# Altium PCB Relay Board.PcbDoc
Units mm, origin at the board's own origin, x right, y up, seen from the top; angles counter-clockwise.
Board outline 209.55 x 146.05 mm, 2 copper layers (Top, Bottom Layer), stack 2.342 mm thick; 12 components, 14 nets, 62 pads, 29 vias.
Unrouted connection lines stored in the file: 5.
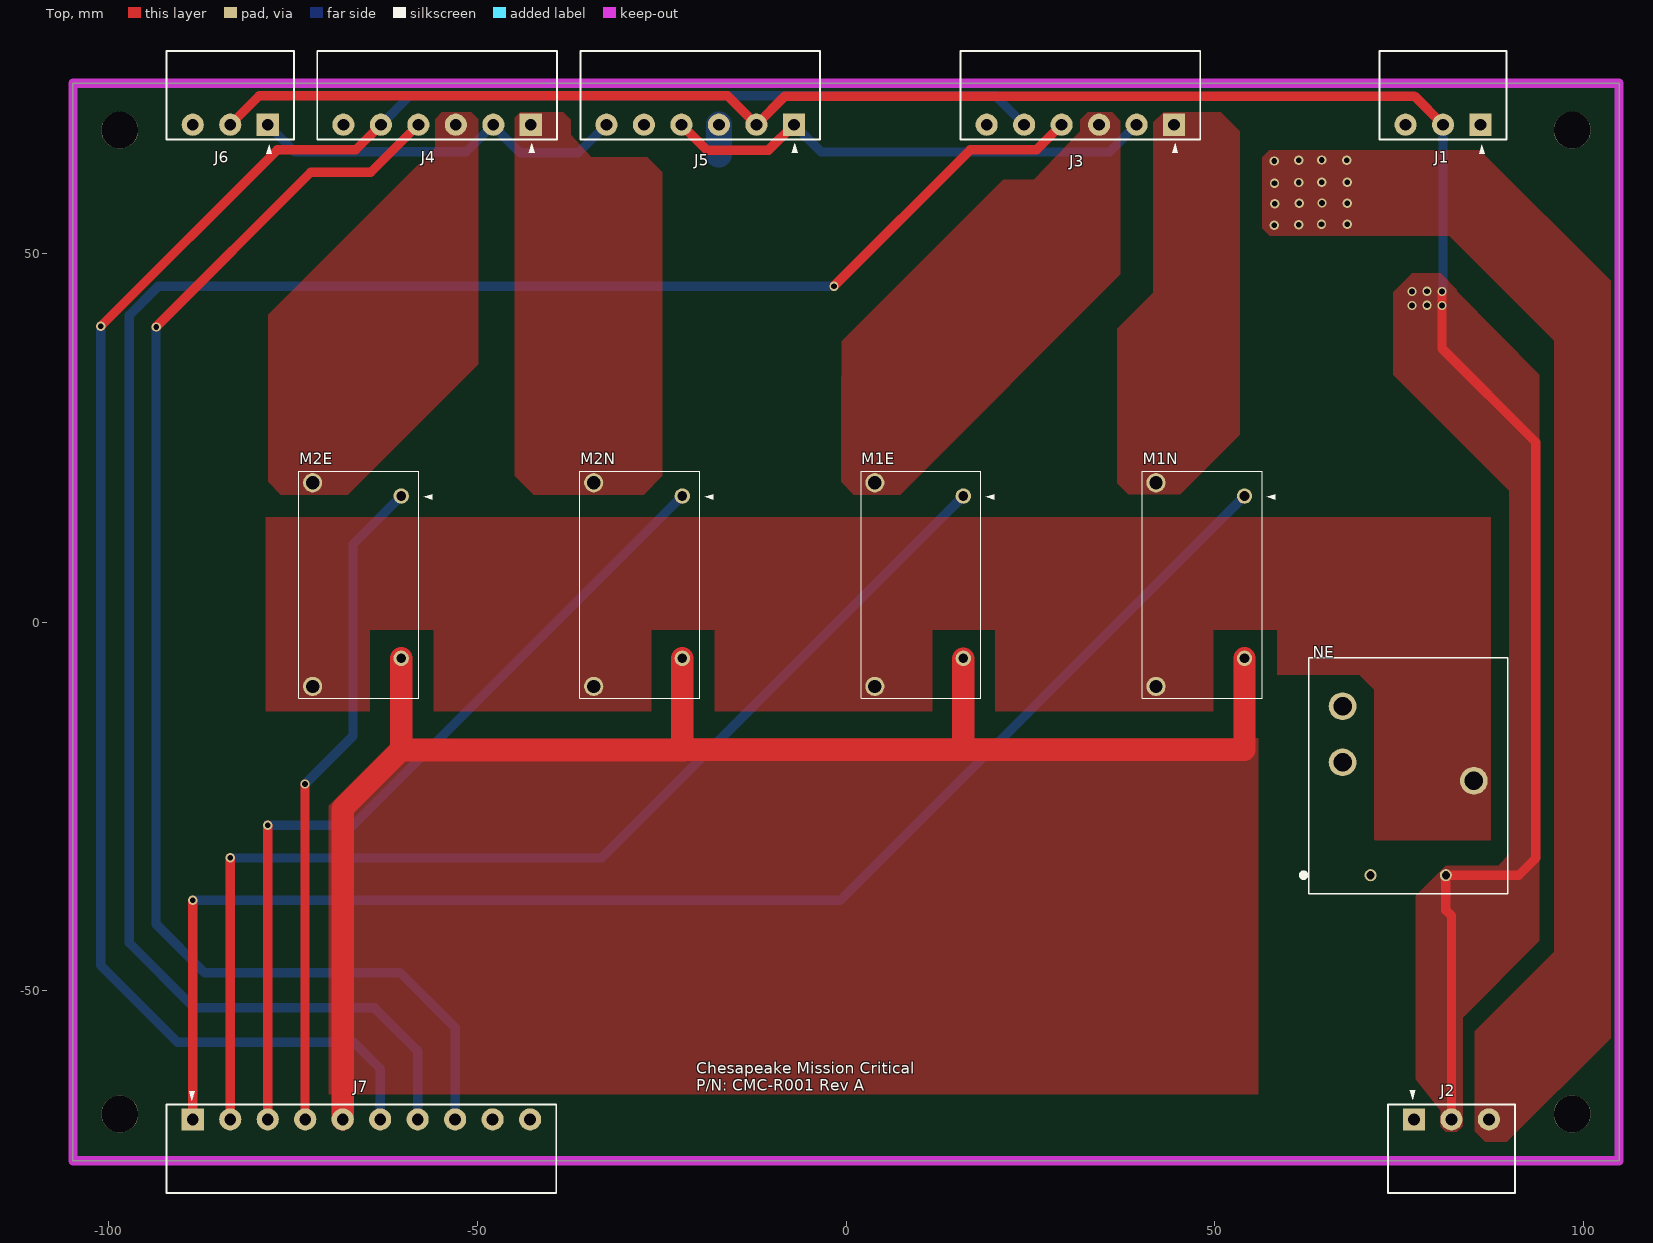
[diagram p0: Top view]
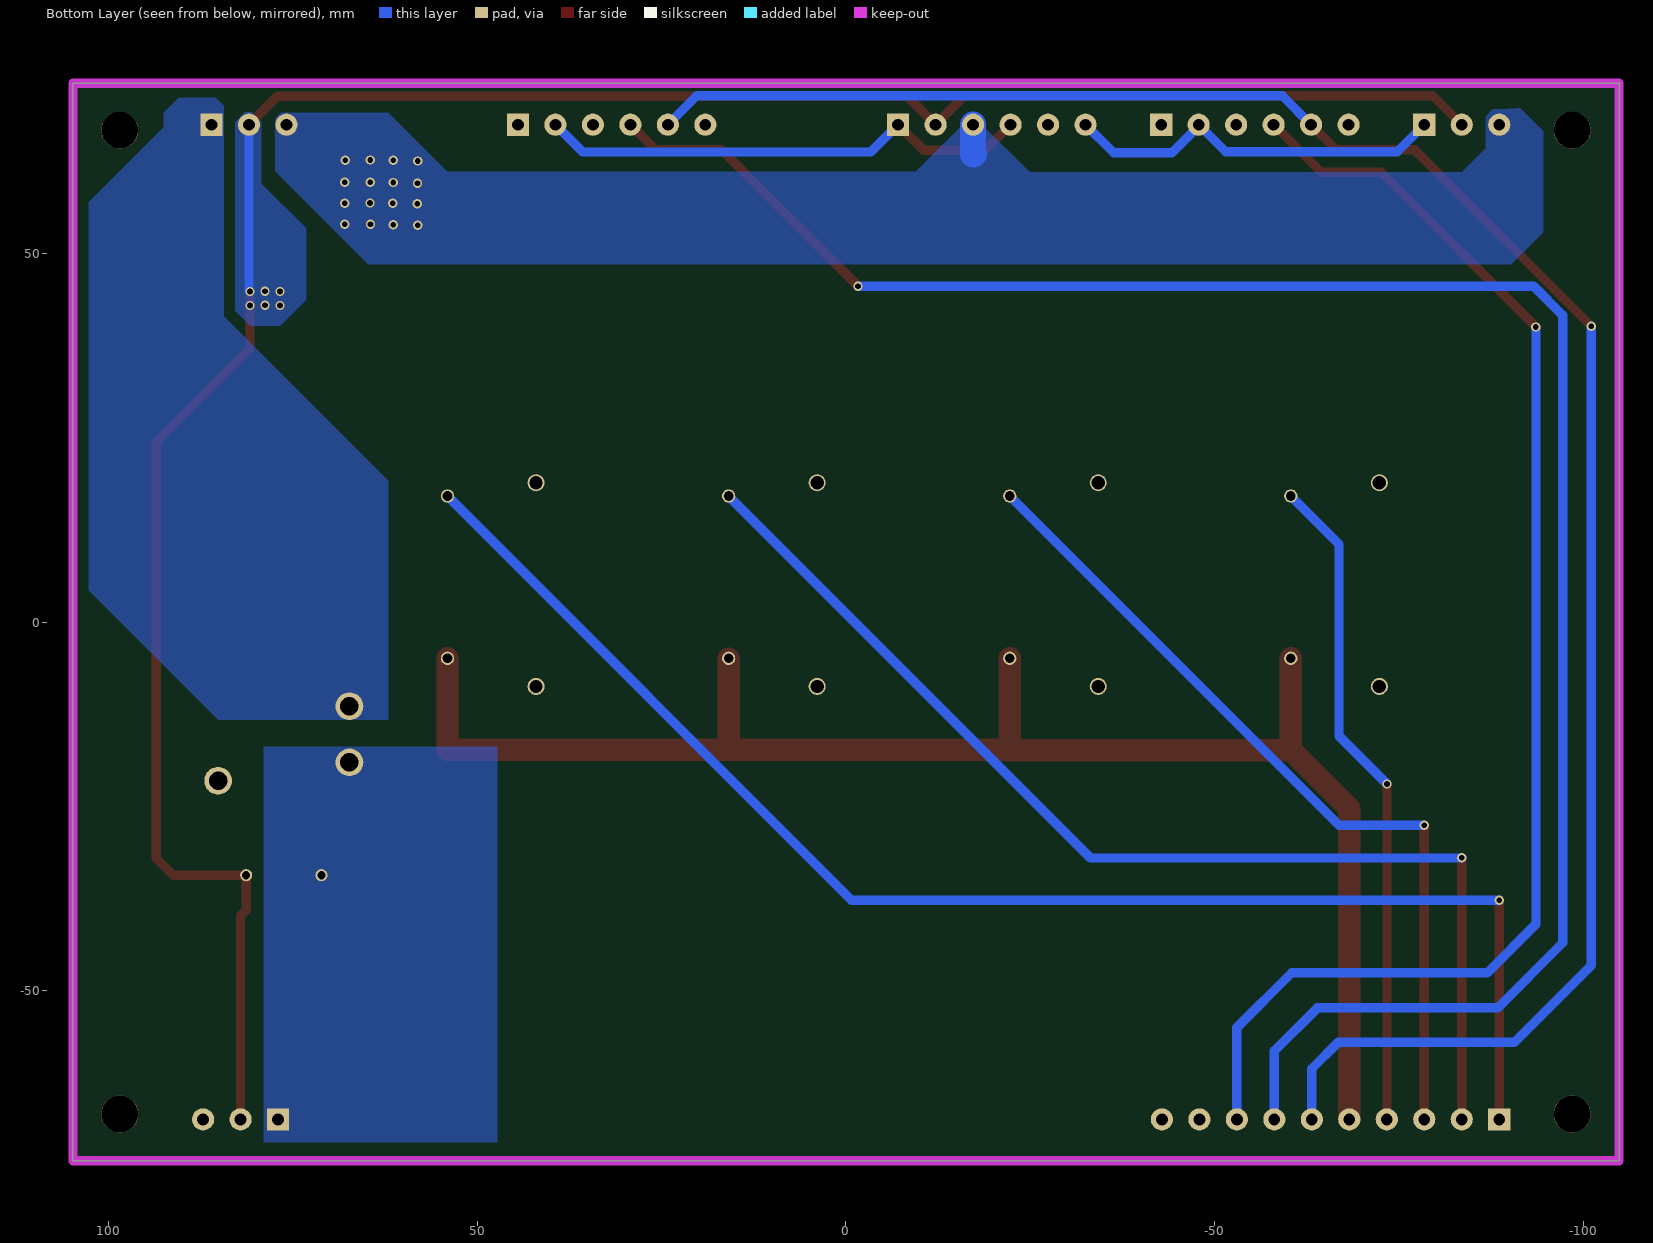
[diagram p1: Bottom Layer view, seen from below]
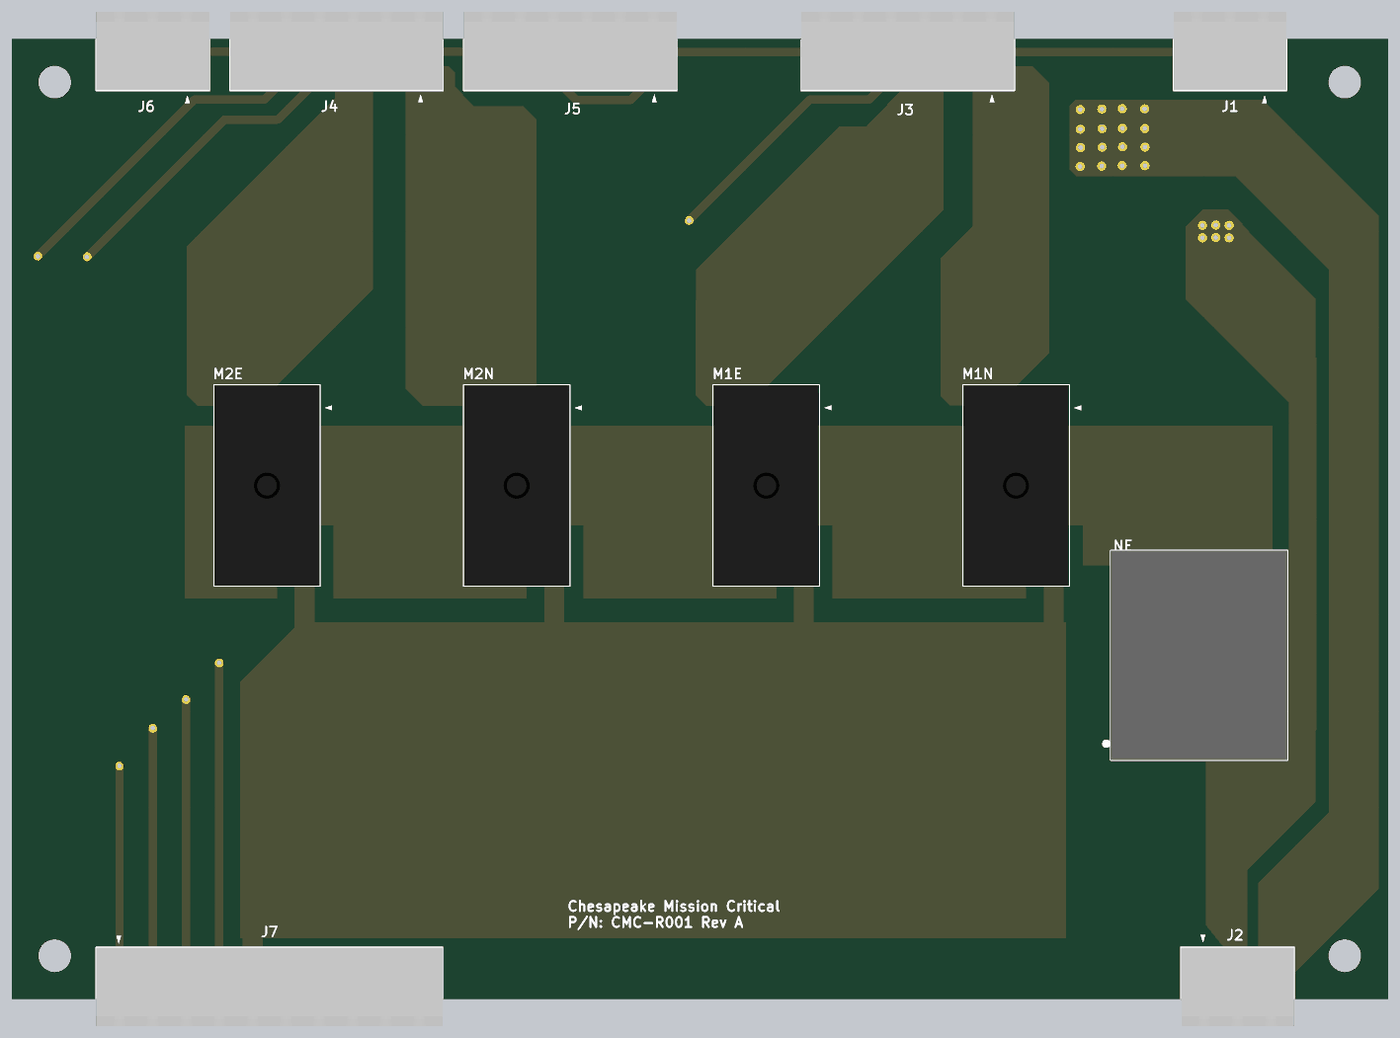
[diagram p2: 3D render of the assembled board from above, using the file's embedded part models]

## Layer stack, top to bottom
Solder Mask Top: solder mask 0.01, Solder Resist, Dk 3.5
Top: signal copper 0.105
Dielectric: dielectric 2.1322, FR-4, Dk 4.2
Bottom Layer: signal copper 0.105
Bottom Solder: solder mask 0.01, Solder Resist, Dk 3.5

## Board outline
-104.775,-73.025 -104.775,-61.912 -104.775,-62.484 -104.775,61.976 -104.775,61.912 -104.775,73.025 104.775,73.025 104.775,61.912 104.775,-49.276 104.775,-73.025

## Design rules (kind name [scope] priority, off if disabled: settings)
Clearance Clearance_Default [All] p1: gap=0.203 ignorepadtopadclearanceinfootprint=FALSE except(0.254: Track-Poly)
ComponentClearance "ComponentClearance - Default - DEFAULT" [All] p1: gap=0 collisioncheckmode=3 verticalgap=0.254 showdistances=FALSE
FanoutControl Fanout_SOIC [IsSOIC] p1: bgadir=Out bgaviamode=Centered fanoutstyle=Auto fanoutdirection=Alternating viagrid=0.025 // Fanout_SOIC (Default Rule)
FanoutControl Fanout_Small [(CompPinCount < 5)] p2: bgadir=Out bgaviamode=Centered fanoutstyle=Auto fanoutdirection=OutThenIn viagrid=0.025 // Fanout_Small (Default Rule)
FanoutControl Fanout_LCC [IsLCC] p3: bgadir=Out bgaviamode=Centered fanoutstyle=Auto fanoutdirection=Alternating viagrid=0.025 // Fanout_LCC (Default Rule)
FanoutControl Fanout_BGA [IsBGA] p4: bgadir=Out bgaviamode=Centered fanoutstyle=Auto fanoutdirection=Alternating viagrid=0.025 // Fanout_BGA (Default Rule)
Height [All] p1: minheight=0 maxheight=30 prefheight=12.7
HoleSize [All] p1: absolutevalues=TRUE maxlimit=5.08 minlimit=0.025 maxpercent=80.000 minpercent=20.000
HoleToHoleClearance "HoleToHoleClearance - Default - DEFAULT" [All] p1: gap=0.305 allowstackedmicrovias=TRUE
Length "Default Length" [All] p1: maxlimit=1270 minlimit=0
MaxMinImpedance "Default Impedance" [All] p1: minimum=50.00 maximum=150.0
MinimumSolderMaskSliver [All] p1: minsoldermaskwidth=0.127
ParallelSegment "Default Parallel Segment Adjasent" [All] p1 off: limit=25.4 gap=5.08
ParallelSegment "Default Parallel Segment Same Layer" [All] p2 off: limit=25.4 gap=5.08
PlaneConnect "Default PlaneConnect" [All] p1: planeconnectstyle=Direct reliefexpansion=0.508 reliefentries=4 reliefconductorwidth=0.381 reliefairgap=0.254
PolygonConnect [All] p1: thpad.connectstyle=Direct thpad.reliefconductorwidth=0.254 thpad.reliefentries=4 thpad.polygonreliefangle="90 Angle" thpad.airgapwidth=0.254 smdpad.connectstyle=Relief smdpad.reliefconductorwidth=0.203 smdpad.reliefentries=4 smdpad.polygonreliefangle="90 Angle" smdpad.airgapwidth=0.203 via.connectstyle=Direct via.reliefconductorwidth=0.254 via.reliefentries=4 via.polygonreliefangle="90 Angle" via.airgapwidth=0.254
RoomDefinition "Relay Board" [InComponentClass('Relay Board')] p1 off: confinementstyle=ConfineIn formatcopy=TRUE lockcomponents=FALSE outline 89.617,31.631 330.663,31.631 330.663,53.221 89.617,53.221
RoutingLayers "RoutingLayers - Default - DEFAULT" [All] p1: top layer_v5=TRUE bottom layer_v5=TRUE
RoutingPriority "RoutingPriority - Default - DEFAULT" [All] p1: routingpriority=3
RoutingTopology "Default Routing Topology" [All] p1: topology=Shortest
RoutingVias "RoutingVias - Default - DEFAULT" [All] p1: holewidth=0.406 width=0.813 viastyle="Through Hole" minholewidth=0.25 minwidth=0.5 maxholewidth=0.406 maxwidth=0.813
SMDToCorner "SMDToCorner - Default - DEFAULT" [All] p1: distance=0
SilkToSilkClearance [All] p1: silktosilkclearance=0.102
SilkToSolderMaskClearance [IsPad] p1: minsilkscreentomaskgap=0.102 clearancetoexposedcopper=TRUE
SolderMaskExpansion "SolderMaskExpansion from CAM settings" [All] p1: expansion=0.051 istentingtop=FALSE
Width "Default Width" [All] p1: maxlimit=6.35 minlimit=0.152 preferedwidth=0.508 minimp=50.000000 maximp=50.000000 favimp=50.000000
15 further rules are at their usual default settings.

## Components (designator, comment, footprint, x,y, rotation, side; value= is the part's Value field where it differs from the comment)
J1 "0395321003" HDR1X3_MOLEX_TERMINAL 89.535,65.405 r180 top locked
J2 "0395321003" HDR1X3_MOLEX_TERMINAL 73.437,-65.405 r0 top locked
J3 "0395321006" HDR1X6_MOLEX_TERMINAL 48.005,65.405 r180 top locked
J4 "0395321006" HDR1X6_MOLEX_TERMINAL -39.18,65.405 r180 top locked
J5 "0395321006" HDR1X6_MOLEX_TERMINAL -3.525,65.405 r180 top locked
J6 "0395321003" HDR1X3_MOLEX_TERMINAL -74.835,65.405 r180 top locked
J7 "0395321010" HDR1X10_MOLEX_TERMINAL -92.075,-65.405 r0 top locked
M1E "G6QE-1A DC24" RELAY_G6QE-1A_OMR 10.16,5.08 r0 top locked
M1N "G6QE-1A DC24" RELAY_G6QE-1A_OMR 48.26,5.08 r0 top locked
M2E "G6QE-1A DC24" RELAY_G6QE-1A_OMR -66.04,5.08 r0 top locked
M2N "G6QE-1A DC24" RELAY_G6QE-1A_OMR -27.94,5.08 r0 top locked
NE "J115F21C120VACS" RELAY_J115F2 76.2,-22.86 r0 top

## Footprints (in the part's own frame and the unit in brackets; to place one, negate y for a bottom-side part, rotate by r counter-clockwise, add the part's x,y. Pads: shape width x height; smd on the part's side, far side on the other; paste and mask are expansions set on the pad)
HDR1X3_MOLEX_TERMINAL [mm]
  rect 3x3 hole 1.6: 1(3.54,-2)
  round 3 hole 1.6: 2(8.62,-2) 3(13.7,-2)
  silkscreen extent 0,-12 17.24,1.96, body extent -0.01,-12 17.24,-0.06, height 8.38
HDR1X6_MOLEX_TERMINAL [mm]
  rect 3x3 hole 1.6: 1(3.54,-2)
  round 3 hole 1.6: 2(8.62,-2) 3(13.7,-2) 4(18.78,-2) 5(23.86,-2) 6(28.94,-2)
  silkscreen extent 0,-12 32.48,1.81, body extent -0.01,-12 32.48,-0.06, height 8.38
HDR1X10_MOLEX_TERMINAL [mm]
  rect 3x3 hole 1.6: 1(3.54,-2)
  round 3 hole 1.6: 2(8.62,-2) 3(13.7,-2) 4(18.78,-2) 5(23.86,-2) 6(28.94,-2) 7(34.02,-2) 8(39.1,-2) 9(44.18,-2) 10(49.26,-2)
  silkscreen extent 0,-12 52.8,1.81, body extent 0,-12 52.8,-0.06, height 8.38
RELAY_G6QE-1A_OMR [mm]
  round 2.1 / inner round 1.808 / far side round 1.808 hole 1.3 mask+0: 1(5.75,12) 2(5.75,-10)
  round 2.6 / inner round 2.308 / far side round 2.308 hole 1.8 mask+0: 3(-6.25,-13.8) 4(-6.25,13.8)
  silkscreen extent -8.13,-15.38 9.94,15.38, body extent -8,-15.25 8,15.25, height 20.5
RELAY_J115F2 [mm]
  round 1.65 hole 1.1: 1(-5.1,-11.45) 2(5.1,-11.45)
  round 3.75 hole 2.5: 3(8.9,1.35) 4(-8.9,3.85) 5(-8.9,11.45)
  silkscreen extent -14.42,-13.96 13.5,18.05, body extent -13.5,-13.95 13.5,18.05, height 27.95

## Part data
J1 J2 J6: library part MOLEX_0395321003, "TERM BLOCK HDR 3POS 90DEG 5.08MM", Manufacturer=Molex, Package=None, Supplier Part Number 1=WM7846-ND, Manufacturer Part Number=0395321003, Supplier 1=Digi-Key
J3 J4 J5: library part MOLEX_0395321006, "TERM BLOCK HDR 6POS 90DEG 5.08MM", Manufacturer=Molex, Package=None, Supplier Part Number 1=900-0395321006-ND, Manufacturer Part Number=0395321006, Supplier 1=Digi-Key
J7: library part MOLEX_0395321010, "TERM BLOCK HDR 10POS 5.08MM", Manufacturer=Molex, Package=None, Supplier Part Number 1=WM7851-ND, Manufacturer Part Number=0395321010, Supplier 1=Digi-Key
M1E M1N M2E M2N: "RELAY PWR PCB SPST-NO 32A 24VDC", Manufacturer=Omron, Supplier Part Number 1=653-G6QE-1ADC24, Copyright="Copyright (C) 2022 Ultra Librarian. All rights reserved.", Manufacturer Part Number="G6QE-1A DC24", Supplier 1=Mouser, Type=DEV
NE: "RELAY UL & TUV GEN PURP SPDT 40A", Manufacturer="CIT Relay and Switch", Supplier Part Number 1=2449-J115F21C120VACS-ND, Manufacturer Part Number=J115F21C120VACS, Supplier 1=Digi-Key, Type=DEV

## Free pads (board coordinates)
  round 5 hole 5 unplated: MH(-98.425,-66.675) MH(-98.425,66.675) MH(98.425,-66.675) MH(98.425,66.675)

## Via types
v1: diameter 1.27, hole 0.762, Top to Bottom Layer, 29 vias

## Nets (pads, with @x,y where several pads share a name; then routed paths per layer and width w, separated by ;. In a path a pad name is that pad's centre, name@x,y a point inside that pad or via, vN(x,y) a via of type N, cw(c..) or ccw(c..) an arc to the next point about the centre after c; other vN are vias at no path point)
NetJ1_1: J1.1 NE.5
NetJ1_2: J1.2 J2.2 J5.2 J6.2 NE.2 | length 322.1
  Top w1.27: J6.2 -79.536,71.324 -16.064,71.324 J5.2 -8.265,71.285 77.035,71.285 J1.2 ; v1(80.772,44.804) 80.772,37.084 93.472,24.384 93.472,-32.004 91.166,-34.31 NE.2 81.3,-39.036 82.057,-39.794 J2.2
  Bottom Layer w1.27: v1(80.772,44.804) 80.915,44.947 J1.2
  other v1: 76.708,42.908 80.772,42.908 78.74,42.957 76.708,44.804 78.74,44.853
NetJ1_3: J1.3 J2.1 J5.3 J6.3 | length 4.5
  Bottom Layer w1.27: J5.3 J5.3@-16.858,67.405
  Bottom Layer w3.556: -17.225,63.41 -17.286,63.41 -17.321,63.445 -17.225,63.541 J5.3
  other v1: 58.04,53.792 61.345,53.863 64.45,53.918 67.933,53.918 58.104,56.677 61.409,56.747 67.933,56.771 64.514,56.803 58.083,59.497 61.387,59.568 67.912,59.591 64.492,59.623 58.056,62.496 61.361,62.566 67.885,62.59 64.466,62.622
NetJ3_1: J3.1 M1N.4
NetJ3_2: J3.2 J5.1 J5.4 | length 67.6
  Top w1.27: J5.4 -18.87,63.97 -10.5,63.97 J5.1
  Bottom Layer w1.27: J5.1 -3.368,63.708 35.688,63.708 J3.2
NetJ3_3: J3.3 M1E.4
NetJ3_4: J3.4 J7.4 | length 276.6
  Top w1.27: v1(-1.621,45.529) 16.858,64.008 25.828,64.008 J3.4
  Bottom Layer w1.27: -58.055,-67.405 -58.055,-58.122 -63.887,-52.29 -88.327,-52.29 -97.157,-43.46 -97.157,41.565 -93.194,45.529 v1(-1.621,45.529)
NetJ3_5: J3.5 J4.5 J7.5 | length 276.9
  Top w1.27: v1(-100.994,40.081) -77.067,64.008 -66.437,64.008 J4.5
  Bottom Layer w1.27: v1@-100.996,40.081 -100.996,-46.536 -90.56,-56.973 -66.693,-56.973 -63.135,-60.53 -63.135,-67.405 ; J4.5 -59.121,71.324 20.226,71.324 J3.5
NetJ4_1: J4.1 M2N.4
NetJ4_2: J4.2 J5.6 J6.1 | length 52.2
  Bottom Layer w1.27: J6.1 -74.715,63.745 -51.46,63.745 J4.2 -47.8,67.222 -44.174,63.596 -36.274,63.596 J5.6
NetJ4_3: J4.3 M2E.4
NetJ4_4: J4.4 J7.3 | length 186.6
  Top w1.27: v1(-93.506,39.985) -72.53,60.96 -64.405,60.96 J4.4
  Bottom Layer w1.27: v1@-93.516,39.961 -93.516,-40.932 -86.929,-47.52 -60.404,-47.52 -52.975,-54.949 -52.975,-67.405
NetJ7_6: J7.6 M1E.2 M1N.2 M2E.2 M2N.2 | length 217.2
  Top w3.048: -68.215,-67.405 -68.215,-25.275 -60.29,-17.35 ; M2E.2 -60.29,-17.35 ; M2N.2 -22.19,-17.35 ; -21.968,-17.35 -22.19,-17.35 ; -21.968,-17.319 15.863,-17.319 ; M1E.2@15.863,-4.967 15.863,-17.319 ; M1N.2 54.01,-17.319 15.863,-17.319 ; -60.29,-17.35 -22.19,-17.35
NetM1E_3: M1E.3 M1N.3 M2E.3 M2N.3 NE.3
pads on no net: J2.3 J3.6 J4.6 J5.5 J7.1 J7.2 J7.7 J7.8 J7.9 J7.10 M1E.1 M1N.1 M2E.1 M2N.1 NE.1 NE.4
copper on no net: | length 554.6
  Top w1.27: -88.535,-67.405 v1(-88.535,-37.691) ; -83.455,-67.405 v1(-83.455,-31.92) ; -78.375,-67.405 v1(-78.375,-27.542) ; v1(-73.326,-21.941) -73.326,-67.374 -73.295,-67.405
  Bottom Layer w1.27: v1(-88.535,-37.691) -0.761,-37.691 54.01,17.08 ; v1(-83.455,-31.92) -83.392,-31.984 -33.154,-31.984 15.91,17.08 ; v1(-78.375,-27.542) -66.812,-27.542 -22.19,17.08 ; v1(-73.326,-21.941) -66.812,-15.428 -66.812,10.558 -60.29,17.08

## Polygon pours and split planes (outlines as drawn)
NetJ1_2 on Bottom Layer "NETJ1_2_L02_P010" (solid, pour order 10): 79.248,67.777 80.559,69.088 81.468,69.088 82.804,67.752 82.804,42.164 80.772,40.132 76.708,40.132 73.152,43.688 73.152,53.34 79.248,59.436
NetJ1_1 on Bottom Layer "NETJ1_1_L02_P000" (solid, pour order 0): 84.328,69.969 84.328,41.466 62.03,19.167 62.03,-13.245 85.065,-13.245 102.616,4.306 102.616,56.896 92.456,67.056 92.456,69.037 90.424,71.069 85.417,71.069
NetJ1_3 on Bottom Layer "NETJ1_3_L02_P007" (solid, pour order 7): -88.535,69.513 -87.685,69.513 -86.679,68.506 -86.679,64.202 -83.421,60.944 -24.876,60.944 -17.979,67.842 -16.229,67.842 -9.438,61.051 54.073,61.051 62.063,69.04 76.58,69.04 77.335,68.285 77.335,61.079 64.78,48.524 -90.18,48.524 -94.488,52.832 -94.488,66.548 -91.415,69.621 -90.814,69.621
no net on Bottom Layer "NONET_L02_P001" (solid, pour order 1): 78.889,-16.874 47.244,-16.874 47.244,-70.528 78.889,-70.528
NetJ1_2 on Top "NETJ1_2_L01_P011" (solid, pour order 11): 82.804,44.853 82.804,45.047 80.607,47.244 76.708,47.244 76.708,47.226 74.168,44.686 74.168,33.528 89.916,17.78 89.916,-31.496 88.392,-33.02 81.28,-33.02 77.216,-37.084 77.216,-61.976 80.607,-66.214 80.607,-68.415 81.28,-69.088 82.804,-69.088 83.557,-68.335 83.557,-53.603 93.98,-43.18 93.98,33.54
NetM1E_3 on Top "NETM1E_3_L01_P002" (solid, pour order 2): 58.42,-7.112 58.42,-1.016 49.784,-1.016 49.784,-12.114 20.204,-12.114 20.204,-1.016 11.691,-1.016 11.691,-12.114 -17.78,-12.114 -17.78,-1.016 -26.416,-1.016 -26.416,-12.114 -55.88,-12.114 -55.88,-1.016 -64.516,-1.016 -64.516,-12.114 -78.612,-12.114 -78.613,14.224 87.376,14.224 87.376,-29.558 71.628,-29.558 71.628,-9.144 69.596,-7.112
NetJ3_1 on Top "NETJ3_1_L01_P003" (solid, pour order 3): 41.656,44.654 36.752,39.75 36.752,18.81 38.228,17.334 45.274,17.334 53.34,25.4 53.34,66.548 50.8,69.088 43.05,69.088 41.656,67.748
NetJ7_6 on Top "NETJ7_6_L01_P009" (solid, pour order 9): -70.104,-64.008 -70.104,-24.892 -60.96,-15.748 55.88,-15.748 55.88,-64.008
NetJ4_3 on Top "NETJ4_3_L01_P006" (solid, pour order 6): -78.295,41.656 -55.7,64.252 -55.7,68.17 -54.782,69.088 -50.79,69.088 -49.873,68.17 -49.873,40.375 -49.873,34.963 -67.558,17.278 -76.582,17.278 -78.295,18.991
NetJ1_3 on Top "NETJ1_3_L01_P008" (solid, pour order 8): 86.665,-70.452 85.246,-68.996 85.246,-55.47 96.012,-44.704 96.012,38.1 81.788,52.324 57.404,52.324 56.388,53.34 56.388,62.992 57.366,63.97 85.89,63.97 103.623,46.237 103.623,-56.397 89.568,-70.452
NetJ4_1 on Top "NETJ4_1_L01_P005" (solid, pour order 5): -24.892,60.96 -26.924,62.992 -34.544,62.992 -37.339,66.04 -37.339,68.076 -38.35,69.088 -44.148,69.088 -44.862,68.375 -44.862,41.606 -44.862,19.8 -42.339,17.278 -27.426,17.278 -24.892,19.812
NetJ3_3 on Top "NETJ3_3_L01_P004" (solid, pour order 4): -0.558,33.409 -0.558,38.05 21.336,59.944 25.472,59.944 31.763,66.548 31.763,68.088 32.762,69.088 36.068,69.088 37.2,67.956 37.2,47.117 7.361,17.278 1.036,17.278 -0.677,18.991 -0.677,33.289

## Keep-outs
Keep-Out Layer:
  lines w1.27: -104.775,-62.484 -104.775,61.976 ; -104.775,-61.912 -104.775,-73.025 104.775,-73.025 104.775,-49.276 104.775,61.912 104.775,73.025 -104.775,73.025 -104.775,61.912

## Other copper
Top:
  text "TOP LAYER" at -11.562,-109.669 h5.08
Bottom Layer:
  text "BOTTOM LAYER" at -16.292,-109.782 h5.08

## Silkscreen, mask and mechanical layers (free items; w line width, h text height)
Silkscreen Top:
  text "Chesapeake Mission Critical / P/N: CMC-R001 Rev A" at -20.32,-63.5 h1.52
  text "SILKSCREEN TOP" at -17.353,-119.424 h5.08
Bottom Overlay:
  text "SILKSCREEN BOTTOM" at 27.94,-119.32 h5.08
Paste Mask Top:
  text "PASTEMASK TOP" at -16.975,-124.21 h5.08
Paste Mask Bottom:
  text "PASTEMASK BOTTOM" at -22.352,-123.892 h5.08
Solder Mask Top:
  text "SOLDERMASK TOP" at -18.739,-128.996 h5.08
Bottom Solder:
  text "SOLDERMASK BOTTOM" at -23.832,-128.996 h5.08
Drill Guide:
  text "DRILL GUIDE" at -13.208,-100.016 h5.08
Board Shape:
  lines w0.254: -2.54,0 2.54,0 ; 0,-2.54 0,2.54
  lines w0.508: -104.775,61.912 -104.775,73.025 104.775,73.025 104.775,49.276 ; -104.775,61.976 -104.775,-61.912 -104.775,-73.025 104.775,-73.025 104.775,-61.912 ; 104.775,-61.976 104.775,49.212
  text "BOARD OUTLINE" at -16.934,-105.154 h5.08
Top Assembly:
  lines w0.254: -2.54,0 2.54,0 ; 0,-2.54 0,2.54
  lines w0.508: -104.775,61.912 -104.775,73.025 104.775,73.025 104.775,49.276 ; -104.775,61.976 -104.775,-61.912 -104.775,-73.025 104.775,-73.025 104.775,-61.912 ; 104.775,-61.976 104.775,49.212
  text "ASSEMBLY TOP" at -16.094,-114.763 h5.08
Bottom Assembly:
  text "ASSEMBLY BOTTOM" at 24.384,-114.748 h5.08
Drill Drawing:
  drawing of 251 lines, arcs and shapes, not listed
  text "1" at -118.161,168.673 h7.62
  text "2" at 21.251,168.673 h7.62
  text "3" at 158.41,168.673 h7.62
  text "4" at 299.207,168.673 h7.62
  text "REVISIONS" at 259.782,160.565 h1.91
  text "ZONE" at 183.244,154.088 h1.91
  text "LTR" at 196.181,154.088 h1.91
  text "DATE" at 318.88,154.088 h1.91
  text "APPROVED" at 339.108,154.088 h1.91
  text "DESCRIPTION" at 245.047,154.028 h1.91
  text "D" at -182.584,124.858 h7.62
  text "D" at 364.15,122.953 h7.62
  text "NOTES: UNLESS OTHERWISE SPECIFIED" at 189.642,122.813 h2.1
  text "1. FABRICATE PER IPC-6012A CLASS 2. / 2. FOR BOARD THICKNESS AND IMPEDANCE DETAILS REFER STACKUP DOCUMENT. / 3. PRINTED WIRING BOARD SHALL COMPLY WITH REQUIREMENTS OF ANSI/J-STD-003. / 4. PLATING FINISH: ENIG (ELECTROLESS NICKEL IMMERSION GOLD - ROHS) / 5. SOLDERMASK ON BOTH SIDES OF THE BOARD SHALL BE LPI, COLOR GREEN. / 6. SILK SCREEN LEGEND TO BE APPLIED PER LAYER STACKUP USING WHITE NON-CONDUCTIVE EPOXY INK. / 7. THIS PRINTED WIRING BOARD IS DESIGNED WITH A MINIMUM CONDUCTOR WIDTH AND SPACING OF 4 MIL & 4 MILS. / 8. ALL VIAS ARE TENTED ON BOTH SIDES UNLESS SOLDERMASK OPENED IN GERBER. / 9. ALL VIAS ON PAD SHOULD BE FILLED WITH NON CONDUCTIVE EPOXY AND SURFACE SHOULD BE FLAT. FLATNESS TOLERANCE FOR VIA ON PADS: +0.000 /- 0.001 INCHES ON BOTH SIDES. THE MANUFACTURER IS REQUESTED TO SIZE PER THEIR SOLDERMASK TOLERANCE. / 10. SOLDER MASK OPENING IS KEPT SAME SIZE AS PAD (1:1) FOR ALL COMPONENTS / 11. VENDOR SHOULD FOLLOW ROHS COMPLIANT PROCESS AND Pb FREE FOR MANUFACTURING / 12. MANUFACTURER'S IDENTIFICATION, DATECODE LETTER SHALL BE SILKSCREENED ON SOLDER SIDE OF THE BOARD. / 13. TRACE WIDTH SHOULD BE ACCURATELY ETCHED. MAX TOLERANCE +/- 1 MIL / 14. ALL DIMENSIONS ARE IN INCHES UNLESS OTHERWISE SPECIFIED. / 15. FLATNESS REQUIREMENTS: / A. BOW AND TWIST OF ASSEMBLY SUB-PANEL OR SINGULATED PWB SHALL NOT EXCEED 0.7% OF LONGEST SIDE / B. TEST IN ACCORDANCE WITH THE CURRENT REVISION OF IPC-TM-650 2.4.22 / 16. PCB MATERIAL REQUIREMENTS: / A. FLAMMABILITY RATING MUST MEET OR EXCEED UL94V-0 REQUIREMENTS. PCB MUST BEAR THE UL94V-0 REGISTERED MATERIAL ID NUMBER. / B. Tg 180 CELSIUS OR EQUIVALENT. / C. EQUIVALENT MATERIAL SHALL BE RoHS COMPLIANT, HALOGEN FREE AND APPROVED BY CHESAPEAKE MISSION CRITICAL. / 17. LAYER TO LAYER REGISTRATION SHALL BE WITHIN +/-2 MIL" at 189.484,23.876 h2.1
  text "C" at 363.977,23.894 h7.62
  text "C" at -182.757,18.179 h7.62
  text "Layer" at 195.828,-2.287 h2.54
  text "Name" at 206.83,-2.287 h2.54
  text "Material" at 229.938,-2.287 h2.54
  text "Thickness" at 249.441,-2.287 h2.54
  text "Constant" at 265.476,-2.287 h2.54
  text "Board Layer Stack" at 280.269,-2.287 h2.54
  text "Silkscreen Top" at 206.83,-7.367 h2.54
  text "Solder Mask Top" at 206.83,-12.447 h2.54
  text "Solder Resist" at 229.938,-12.447 h2.54
  text "0.010mm" at 249.441,-12.447 h2.54
  text "3.5" at 265.476,-12.447 h2.54
  text "REV." at 362.032,-12.445 h1.36 r90
  text "1" at 195.828,-17.527 h2.54
  text "Top" at 206.83,-17.527 h2.54
  text "0.105mm" at 249.441,-17.527 h2.54
  text "Dielectric" at 206.83,-22.607 h2.54
  text "FR-4" at 229.938,-22.607 h2.54
  text "2.132mm" at 249.441,-22.607 h2.54
  text "4.2" at 265.476,-22.607 h2.54
  text "2" at 195.828,-27.687 h2.54
  text "Bottom Layer" at 206.83,-27.687 h2.54
  text "0.105mm" at 249.441,-27.687 h2.54
  text "Bottom Solder" at 206.83,-32.767 h2.54
  text "Solder Resist" at 229.938,-32.767 h2.54
  text "0.010mm" at 249.441,-32.767 h2.54
  text "3.5" at 265.476,-32.767 h2.54
  text "Total board thickness:" at 195.828,-37.847 h2.54
  text "2.362mm" at 249.441,-37.847 h2.54
  text "Symbol" at 193.739,-45.911 h3.05
  text "Count" at 206.472,-45.911 h3.05
  text "Hole Size" at 217.998,-45.911 h3.05
  text "Plated" at 242.978,-45.911 h3.05
  text "Hole Type" at 253.956,-45.911 h3.05
  text "Drill Layer Pair" at 269.845,-45.911 h3.05
  text "Via/Pad" at 293.821,-45.911 h3.05
  text "29" at 206.472,-51.185 h2.54
  text "30.00mil (0.762mm)" at 217.998,-51.185 h2.54
  text "PTH" at 242.978,-51.185 h2.54
  text "Round" at 253.956,-51.185 h2.54
  text "Top - Bottom Layer" at 269.845,-51.185 h2.54
  text "Via" at 293.821,-51.185 h2.54
  text "2" at 206.472,-56.459 h2.54
  text "43.31mil (1.100mm)" at 217.998,-56.459 h2.54
  text "PTH" at 242.978,-56.459 h2.54
  text "Round" at 253.956,-56.459 h2.54
  text "Top - Bottom Layer" at 269.845,-56.459 h2.54
  text "Pad" at 293.821,-56.459 h2.54
  text "8" at 206.472,-61.733 h2.54
  text "51.18mil (1.300mm)" at 217.998,-61.733 h2.54
  text "PTH" at 242.978,-61.733 h2.54
  text "Round" at 253.956,-61.733 h2.54
  text "Top - Bottom Layer" at 269.845,-61.733 h2.54
  text "Pad" at 293.821,-61.733 h2.54
  text "37" at 206.472,-67.008 h2.54
  text "62.99mil (1.600mm)" at 217.998,-67.008 h2.54
  text "PTH" at 242.978,-67.008 h2.54
  text "Round" at 253.956,-67.008 h2.54
  text "Top - Bottom Layer" at 269.845,-67.008 h2.54
  text "Pad" at 293.821,-67.008 h2.54
  text "8" at 206.472,-72.282 h2.54
  text "70.87mil (1.800mm)" at 217.998,-72.282 h2.54
  text "PTH" at 242.978,-72.282 h2.54
  text "Round" at 253.956,-72.282 h2.54
  text "Top - Bottom Layer" at 269.845,-72.282 h2.54
  text "Pad" at 293.821,-72.282 h2.54
  text "DWG NO." at 362.032,-77.251 h1.36 r90
  text "3" at 206.472,-77.556 h2.54
  text "98.43mil (2.500mm)" at 217.998,-77.556 h2.54
  text "PTH" at 242.978,-77.556 h2.54
  text "Round" at 253.956,-77.556 h2.54
  text "Top - Bottom Layer" at 269.845,-77.556 h2.54
  text "Pad" at 293.821,-77.556 h2.54
  text "4" at 206.472,-82.83 h2.54
  text "196.85mil (5.000mm)" at 217.998,-82.83 h2.54
  text "NPTH" at 242.978,-82.83 h2.54
  text "Round" at 253.956,-82.83 h2.54
  text "Top - Bottom Layer" at 269.845,-82.83 h2.54
  text "Pad" at 293.821,-82.83 h2.54
  text "91 Total" at 206.472,-88.104 h2.54
  text "B" at -182.584,-88.501 h7.62
  text "CAGE CODE" at 362.032,-100.7 h1.36 r90
  text "SIZE" at 362.032,-115.185 h1.36 r90
  text "No SILKSCREEN BOTTOM/PASTEMASK TOP/BOTTOM" at -51.816,-134.112 h5.08
  text "PROJECTION" at 185.461,-164.129 h1.52
  text "APPROVALS" at 127.584,-170.088 h4.76
  text "XXXXX" at 264.064,-172.716 h4.44
  text "DATE:" at 162.29,-176.702 h1.52
  text "DRN BY:" at 114.18,-177.083 h1.52
  text "UNLESS OTHERWISE SPECIFIED" at 191.176,-177.083 h1.52
  text "A.A" at 131.733,-179.652 h2.29
  text "XX/XX/XX" at 168.433,-179.955 h1.91
  text "DIMENSIONS ARE IN INCHES" at 192.769,-180.131 h1.52
  text "TITLE" at 240.94,-181.953 h1.91
  text "CHK:" at 114.318,-184.703 h1.52
  text "2 PLC" at 205.758,-185.084 h1.52
  text "3 PLC" at 216.807,-185.084 h1.52
  text "ANGLES" at 228.549,-185.084 h1.52
  text "FABRICATION DRAWING" at 260.901,-188.474 h3.81
  text "TOLERANCES" at 186.085,-189.275 h1.52
  text "+" at 206.485,-190.799 h1.52
  text "+" at 217.534,-190.799 h1.52
  text "APPD:" at 114.63,-192.323 h1.52
  text "-.01" at 206.347,-192.323 h1.52
  text "-.005" at 217.777,-192.323 h1.52
  text "2" at 232.532,-192.323 h1.52
  text "A" at -182.931,-195.181 h7.62
  text "MATERIAL:" at 185.808,-198.038 h1.52
  text "XXXXX" at 261.028,-198.126 h3.81
  text "A" at 363.803,-198.991 h7.62
  text "APPD:" at 115.011,-199.943 h1.52
  text "SIZE" at 242.23,-206.718 h1.91
  text "CAGE CODE" at 255.435,-206.718 h1.91
  text "DWG NO." at 278.728,-206.718 h1.91
  text "REV." at 349.118,-207.099 h1.91
  text "PROJ MGR:" at 114.526,-207.563 h1.52
  text "XXXXX" at 294.429,-215.017 h3.81
  text "B" at 243.616,-215.064 h3.81
  text "FINISH:" at 185.738,-215.564 h1.52
  text "A" at 351.147,-216.185 h3.81
  text "PROD REL DATE:" at 114.769,-217.088 h1.52
  text "SCALE" at 240.966,-223.101 h1.91
  text "ENGRG MGR:" at 120.484,-223.184 h1.52
  text "SHEET" at 319.919,-223.482 h1.91
  text "DO NOT SCALE DWG" at 282.495,-225.387 h1.91
  text "NONE" at 258.682,-225.601 h2.67
  text "1 OF 1" at 337.999,-225.685 h2.29
  text "1" at -116.256,-242.806 h7.62
  text "2" at 19.346,-242.806 h7.62
  text "3" at 160.315,-242.806 h7.62
  text "4" at 297.302,-242.806 h7.62

## Dimensions
104.775,-73.025 to 104.775,73.025 on Top Assembly
-104.775,-73.025 to 104.775,-73.025 on Top Assembly
-92.075,-77.405 to -104.775,-73.025 on Top Assembly
73.437,-77.405 to -39.275,-77.405 on Top Assembly
90.677,-77.405 to 104.775,-73.025 on Top Assembly
89.535,77.405 to 104.775,73.025 on Top Assembly
48.005,77.405 to 72.295,77.405 on Top Assembly
-3.525,77.405 to 15.525,77.405 on Top Assembly
-39.18,77.405 to -36.005,77.405 on Top Assembly
-74.835,77.405 to -71.66,77.405 on Top Assembly
-92.075,77.405 to -104.775,73.025 on Top Assembly

## Text inside footprints (layer, text, board x,y; h text height)
J1: Top Assembly "1" at 86.195,67.405 h1.02 r180; Top Assembly "3" at 75.835,67.393 h1.02 r180
J2: Top Assembly "1" at 76.778,-67.405 h1.02; Top Assembly "3" at 87.137,-67.393 h1.02
J3: Top Assembly "1" at 44.719,67.786 h1.02 r180; Top Assembly "6" at 19.319,67.774 h1.02 r180
J4: Top Assembly "6" at -67.866,67.774 h1.02 r180; Top Assembly "1" at -42.466,67.786 h1.02 r180
J5: Top Assembly "6" at -32.211,67.774 h1.02 r180; Top Assembly "1" at -6.811,67.786 h1.02 r180
J6: Top Assembly "3" at -88.535,67.393 h1.02 r180; Top Assembly "1" at -78.175,67.405 h1.02 r180
J7: Top Assembly "1" at -88.789,-67.786 h1.02; Top Assembly "10" at -43.248,-67.734 h1.02